# Altium PCB UHF_Reader_MultiFunction_V4.PcbDoc (part 2 of 3)
Units mm, origin at the board's own origin, x right, y up, seen from the top; angles counter-clockwise.
Board outline 74.4 x 63.4 mm, 6 copper layers (Top Layer, Internal Plane 1, Signal Layer 1, Signal Layer 2, Signal Layer 3, Bottom Layer), stack 1.21 mm thick; 381 components, 239 nets, 1152 pads, 1873 vias.
Unrouted connection lines stored in the file: 49.
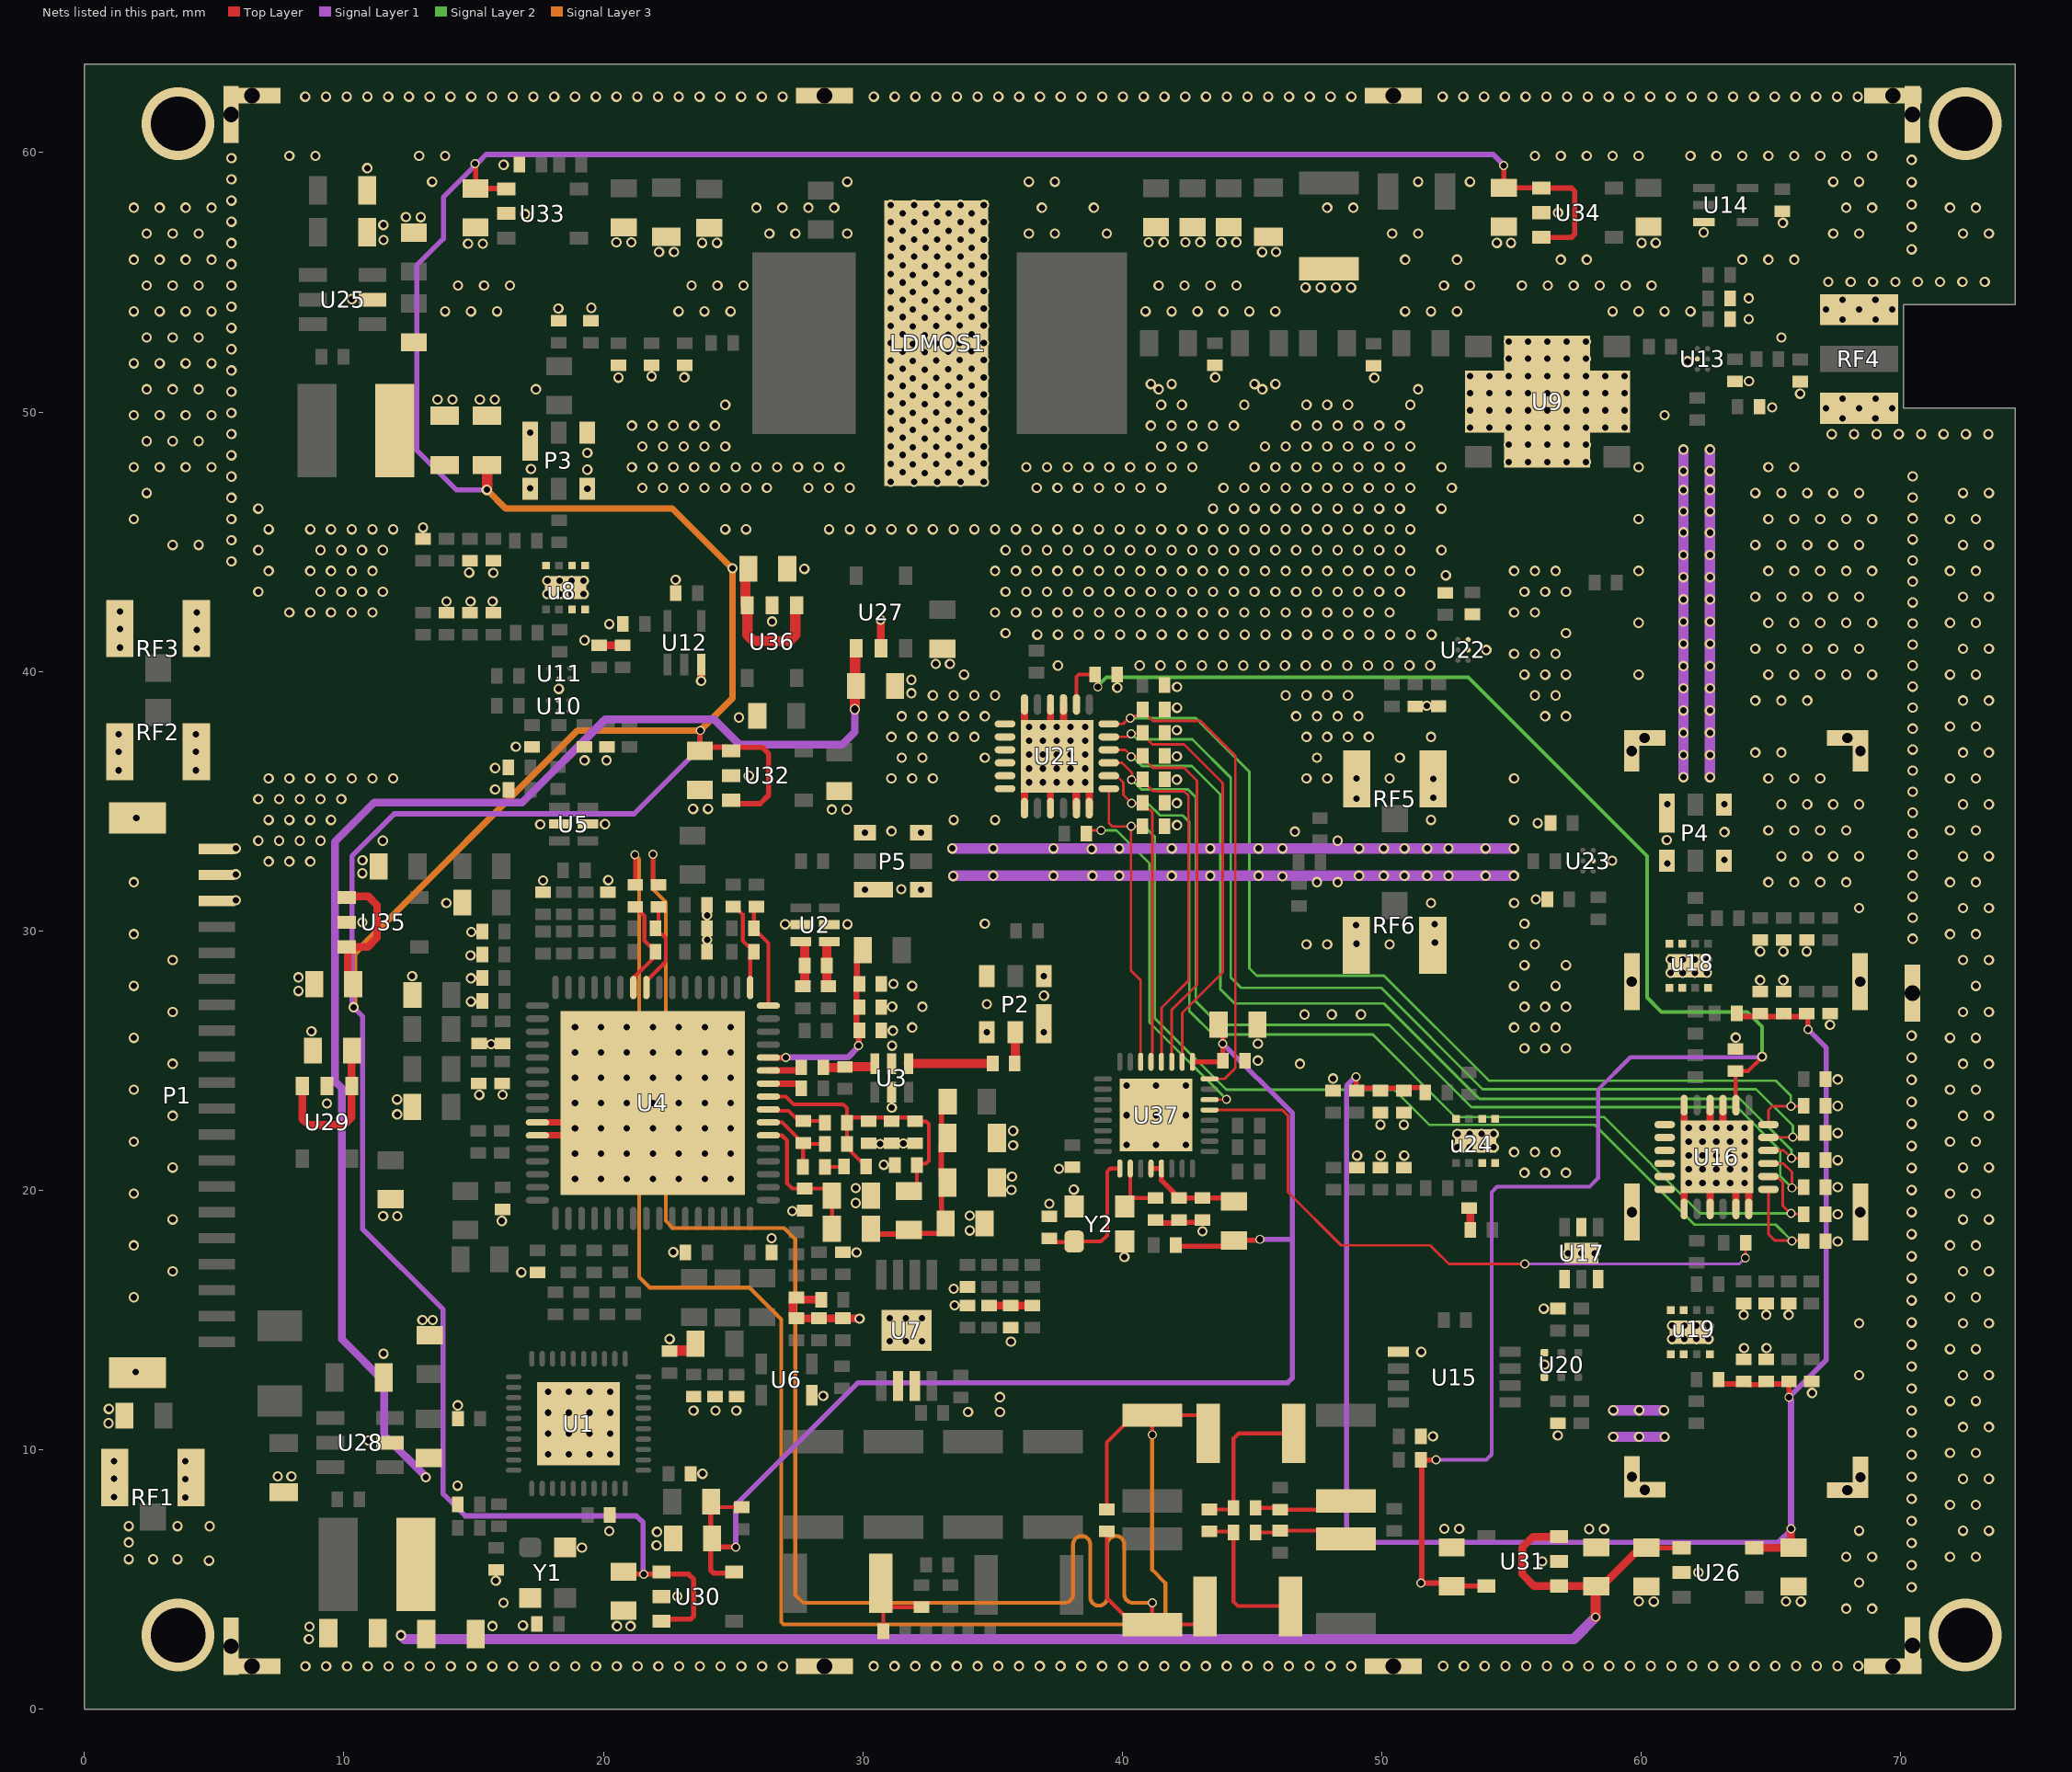
[diagram p6: the nets of this part, all layers, seen from the top]

## Via types
v1: diameter 0.4, hole 0.25, Top Layer to Bottom Layer, tented both sides, 1555 vias
v2: diameter 0.4, hole 0.25, Top Layer to Bottom Layer, tented top, 149 vias
v3: diameter 0.35, hole 0.25, Top Layer to Bottom Layer, tented both sides, 117 vias
v4: diameter 0.4, hole 0.25, Top Layer to Bottom Layer, 32 vias
v5: diameter 0.4, hole 0.3, Top Layer to Bottom Layer, tented both sides, 12 vias
v6: diameter 0.4, hole 0.3, Top Layer to Bottom Layer, 4 vias
v7: diameter 2.8, hole 2.1, Top Layer to Bottom Layer, 4 vias

## Nets (pads, with @x,y where several pads share a name; then routed paths per layer and width w, separated by ;. In a path a pad name is that pad's centre, name@x,y a point inside that pad or via, vN(x,y) a via of type N, cw(c..) or ccw(c..) an arc to the next point about the centre after c; other vN are vias at no path point) (continued)
ATTN1_D1: C130.2 C162.2 U16.24 U21.24 U37.16 | length 57.3
  Top Layer w0.1: U21.24@39.482,37.978 40.032,37.978 40.256,38.201 40.375,38.201 40.464,38.29 40.61,38.29 40.744,38.425 40.744,38.5 C162.2@40.785,38.54 ; C162.2@40.785,38.465 40.96,38.29 40.983,38.29 41.183,38.09 43.01,38.09 44.359,36.741 44.359,24.712 43.941,24.294 U37.16@43.364,24.294 ; U16.24@64.904,22.533 64.904,23.095 65.047,23.239 v3(65.769,23.239) 66.229,23.239 66.235,23.233 C130.2@66.257,23.256
  Signal Layer 2 w0.1: v3@40.357,38.136 40.423,38.201 42.832,38.201 44.9,36.133 44.9,28.558 45.182,28.276 50.082,28.276 54.132,24.226 ; 54.157,24.226 65.182,24.226 65.769,23.639 v3(65.769,23.239)
  other v3: 40.307,38.201
ATTN1_D2: C132.2 C163.2 U16.23 U21.23 U37.18 | length 54.9
  Top Layer w0.1: U21.23@39.482,37.478 40.25,37.478 40.34,37.567 v3(40.34,37.601) 40.344,37.605 40.751,37.605 C163.2@40.785,37.639 40.785,37.564 41.16,37.189 42.381,37.189 43.875,35.695 43.875,28.396 42.315,26.836 U37.18@42.315,24.951 ; U16.23@64.904,22.033 64.912,22.041 65.834,22.041 v3(65.842,22.05) 65.859,22.033 66.078,22.033 C132.2@66.257,22.212
  Signal Layer 2 w0.1: v3@40.307,37.551 40.402,37.551 40.576,37.377 42.706,37.377 44.182,35.901 44.182,28.201 44.582,27.801 49.982,27.801 53.882,23.901 64.432,23.901 65.842,22.491 v3(65.842,22.05)
ATTN1_D3: C133.2 C164.2 U16.22 U21.22 U37.19 | length 52.9
  Top Layer w0.1: U21.22@39.482,36.978 40.11,36.978 40.347,36.741 v3(40.347,36.714) 40.761,36.714 C164.2@40.785,36.737 ; C164.2@40.785,36.685 41.182,36.289 41.346,36.289 41.35,36.284 42.383,36.284 42.875,35.792 42.875,27.924 41.902,26.951 41.902,26.18 ; U37.19@41.907,24.951 41.907,26.18 ; U16.22@64.904,21.533 65.491,21.533 v3(65.788,21.236) 66.19,21.236 C133.2@66.257,21.169
  Signal Layer 2 w0.1: v3@40.457,36.651 40.757,36.351 42.682,36.351 43.782,35.251 43.782,27.851 43.774,27.842 43.774,27.76 44.332,27.201 50.082,27.201 53.732,23.551 ; 53.757,23.526 63.807,23.526 65.788,21.546 v3(65.788,21.236)
ATTN1_D4: C135.1 C165.1 U16.21 U21.21 U37.20 | length 53.5
  Top Layer w0.1: U21.21@39.482,36.478 39.988,36.478 40.378,36.088 40.378,35.849 v3(40.353,35.824) 40.775,35.824 C165.1@40.785,35.834 ; C165.1@40.785,35.783 41.181,35.386 41.346,35.386 41.348,35.384 42.381,35.384 42.55,35.215 42.55,28.075 41.507,27.032 U37.20@41.507,24.951 ; U16.21@64.904,21.033 65.477,21.033 65.805,20.705 65.805,20.1 v3(65.811,20.095) C135.1@66.164,20.095
  Signal Layer 2 w0.1: v3@40.407,35.751 40.44,35.751 40.74,35.451 42.532,35.451 42.832,35.151 42.832,27.276 43.732,26.376 50.282,26.376 53.457,23.201 ; 53.507,23.201 63.698,23.201 65.357,21.541 65.357,20.548 v3(65.811,20.095)
ATTN1_D5: C138.1 C166.1 U16.20 U21.20 U37.21 | length 50.9
  Top Layer w0.1: U21.20@39.482,35.978 39.771,35.978 40.039,35.71 40.039,35.24 v3(40.355,34.924) 40.357,34.922 40.774,34.922 C166.1@40.794,34.942 ; C166.1@40.785,34.933 40.785,34.857 40.96,34.683 41.049,34.683 41.157,34.574 41.157,25.278 41.107,25.228 U37.21@41.107,24.951 ; U16.20@64.904,20.533 65.215,20.533 65.454,20.294 65.454,19.405 65.746,19.112 v3(65.771,19.112) ; v3@65.746,19.081 C138.1@66.257,19.081
  Signal Layer 2 w0.1: v3@40.403,34.944 40.423,34.924 40.985,34.924 41.457,34.451 42.332,34.451 42.582,34.201 42.582,26.918 43.499,26.001 49.657,26.001 52.807,22.851 ; 52.832,22.826 58.557,22.826 62.271,19.112 v3(65.771,19.112)
ATTN1_D6: C139.1 C167.1 U16.19 U21.19 U37.22 | length 51.3
  Top Layer w0.1: U21.19@39.482,35.478 39.482,34.161 39.618,34.025 40.336,34.025 40.336,28.473 40.707,28.101 U37.22@40.707,24.951 ; v3(40.338,34.037) 40.756,34.037 40.767,34.025 C167.1@40.782,34.04 ; U16.19@64.904,20.033 64.904,18.304 65.147,18.061 66.234,18.061 C139.1@66.257,18.038
  Signal Layer 2 w0.1: v3(40.338,34.037) 40.847,34.037 41.257,33.626 41.257,26.626 44.007,23.876 50.482,23.876 51.832,22.526 ; 51.852,22.522 58.203,22.522 58.357,22.367 62.049,18.676 65.182,18.676 v3(65.809,18.049)
DC_5V: C191.1 C194.1 C195.1 C196.1 C204.1 L47.1 R53.2 U26.1 U27.1 U31.1 U31.3 | length 109
  Top Layer w0.2: C191.1@60.202,6.227 60.213,6.217 U26.1@61.561,6.217
  Top Layer w0.3: U31.3@56.834,6.647 55.834,6.647 55.408,6.222 55.408,5.21 55.871,4.747 U31.1@56.834,4.747 58.263,4.747 C204.1@58.273,4.737 ; C204.1@58.246,4.71 C204.1@58.273,4.737 ; C191.1@60.202,6.227 59.973,6.227 58.483,4.737 C204.1@58.273,4.737
  Top Layer w0.4: v5(29.691,38.539) C196.1@29.691,39.439 ; C196.1@29.739,39.439 29.702,39.476 29.702,40.842 U27.1@29.749,40.89 ; v3(58.246,3.546) C204.1@58.246,4.71
  Signal Layer 1 w0.3: v1@13.157,8.965 11.55,10.573 11.55,12.633 9.925,14.258 9.925,23.928 9.65,24.203 9.65,33.425 11.175,34.95 16.875,34.95 20.076,38.151 24.274,38.151 25.25,37.175 29.2,37.175 29.691,37.666 v5(29.691,38.539)
  Signal Layer 1 w0.4: v1(12.196,2.847) 12.343,2.7 57.4,2.7 v3(58.246,3.546)
  other v1: 13.157,8.941
EX_CTL: R18.1 R21.2 R22.2 | length 1.7
  Top Layer w0.3: R18.1@34.834,15.568 34.843,15.559 R22.2@36.528,15.559
GD32_VDDA: C218.2 C219.2 L48.2 U37.4 U37.5 | length 4
  Top Layer w0.2: U37.4@41.107,20.837 U37.5@41.507,20.837 41.507,20.381 C218.2@42.183,19.705 C219.2@43.083,19.705 44.163,19.705 L48.2@44.3,19.568
GD_OSC_IN: C217.2 U37.1 Y2.1 | length 5.1
  Top Layer w0.15: C217.2@37.007,18.088 37.095,18 37.744,18 ; Y2.1@38.144,18.025 39.18,18.025 39.418,18.264 39.418,20.721 39.534,20.837 U37.1@39.907,20.837
GD_OSC_OUT: C216.1 U37.2 Y2.3 | length 2.6
  Top Layer w0.15: Y2.3@40.094,19.375 Y2.3@40.307,19.589 ; U37.2@40.307,20.837 Y2.3@40.307,19.589 ; C216.1@41.283,19.705 40.424,19.705 Y2.3@40.307,19.589
GND: C1.2 C2.2 C3.1 C5.2 C6.2 C7.1 C8.2 C9.2 C10.1 C11.1 C12.1 C13.1 C17.1 C25.1 C26.1 C31.1 C32.1 C33.1 C43.1 C49.1 C50.1 C51.1 C52.1 C58.2 C59.1 C60.2 C61.1 C62.1 C63.1 C64.2 C65.2 C66.1 C67.1 C68.1 C69.1 C70.1 C71.1 C72.1 C73.2 C74.2 C75.1 C76.1 C77.1 C78.1 C80.2 C81.1 C85.1 C86.1 C87.2 C88.1 C89.1 C90.1 C91.1 C92.1 C93.1 C94.2 C95.1 C96.1 C97.2 C98.1 C99.1 C100.1 C102.1 C103.1 C110.2 C111.2 C112.2 C113.1 C114.1 C115.1 C118.1 C119.1 C122.1 C123.2 C125.2 C126.2 C128.2 C129.2 C130.1 C131.2 C132.1 C133.1 C134.1 C135.2 C136.2 C137.2 C138.2 C139.2 C141.1 C142.1 C143.1 C144.1 C145.1 C146.1 C147.1 C148.1 C149.1 C150.1 C152.2 C161.2 C162.1 C163.1 C164.1 C165.2 C166.2 C167.2 C168.2 C169.1 C170.1 C171.1 C172.2 C173.2 C174.1 C175.2 C177.1 C184.2 C185.2 C187.2 C188.2 C189.2 C190.2 C191.2 C192.2 C194.2 C195.2 C196.2 C197.2 C198.2 C199.2 C200.2 C201.2 C202.2 C203.2 C204.2 C205.2 C206.2 C207.2 C208.2 C209.2 C210.2 C211.2 C212.2 C213.2 C214.2 C215.2 C216.2 C217.1 C218.1 C219.1 C220.1 C221.1 D1.2 L3.1 LDMOS1.3 P1.18 P1.19 P1.20 P1.21 P2.1 P2.3 P2.4 P2.6 P3.1 P3.3 P3.4 P3.6 P4.1 P4.3 P4.4 P4.6 P5.1 P5.3 P5.4 P5.6 pad.1 R14.2 R15.2 R20.1 R21.1 R23.1 R30.1 R31.1 R32.1 R33.1 R36.2 R42.1 R51.1 R54.1 R57.1 RF1.2 RF1.3 RF2.2 RF2.3 RF3.2 RF3.3 RF4.2 RF4.3 RF5.2 RF5.3 RF6.2 RF6.3 RX2.2 U1.41 U2.2 U2.5 U3.2 U3.5 U4.26 U4.27 U4.65 U5.2 U5.5 U6.2 U7.6 U7.7 U7.9 u8.0 u8.3 u8.4 u8.5 u8.6 u8.8 U9.5 U10.2 U11.2 U12.3 U13.2 U14.3 U15.5 U16.3 U16.4 U16.6 U16.7 U16.8 U16.9 U16.10 U16.11 U16.12 U16.13 U16.15 U16.17 U16.18 U16.25 U17.1 U17.3 U17.5 U17.7 u18.0 u18.3 u18.4 u18.5 u18.6 u18.8 u19.0 u19.3 u19.4 u19.5 u19.6 u19.8 U20.3 U20.4 U21.3 U21.4 U21.6 U21.7 U21.8 U21.9 U21.10 U21.11 U21.12 U21.13 U21.15 U21.17 U21.18 U21.25 U22.2 U23.2 u24.0 u24.3 u24.4 u24.5 u24.6 u24.8 U25.2 U26.2 U27.2 U28.2 U29.2 U30.2 U31.2 U32.2 U33.2 U34.2 U35.2 U36.2 U37.33 Y1.2 Y1.4 Y2.2 Y2.4 | length 93.9
  Top Layer w0.1: v1(10.711,32.218) v1@10.713,32.22 ; v1@10.713,32.716 v1(10.715,32.718)
  Top Layer w0.2: C216.2@41.283,18.855 41.399,18.74 42.068,18.74 C218.1@42.183,18.855 42.277,18.762 42.99,18.762 C219.1@43.083,18.855
  Top Layer w0.25: U4.27@17.457,22.115 18.63,22.115 v1(18.907,22.392) 18.684,22.615 U4.26@17.457,22.615
  Top Layer w0.28: U21.3@37.732,38.728 37.732,37.598 ccw(c38.006,37.598) v1(38.006,37.324) ; v1(38.57,35.724) cw(c38.57,35.57) 38.724,35.57 U21.18@38.724,34.728 ; v1(62.895,21.879) 63.153,22.138 U16.3@63.153,23.283 ; v1(63.427,20.813) cw(c63.427,20.586) 63.654,20.586 U16.17@63.654,19.283 ; v1(63.991,20.813) cw(c63.991,20.658) 64.146,20.658 U16.18@64.146,19.283
  Top Layer w0.3: C103.1@19.875,41.025 19.89,41.01 C86.1@20.738,41.01 ; v1(23.764,39.637) 23.766,39.639 23.766,40.259 U12.3@23.768,40.261 ; R20.1@27.439,15.867 27.367,15.867 27.292,15.792 27.292,15.142 27.367,15.067 C74.2@27.439,15.067 R14.2@28.314,15.067 R15.2@29.227,15.067 29.842,15.067 v1@29.85,15.075 ; R20.1@27.531,15.85 27.599,15.782 C85.1@28.398,15.782 ; v1(30.687,41.987) 30.693,41.981 30.693,40.896 U27.2@30.699,40.889 ; U21.25@38.2,35.55 38.232,35.518 U21.17@38.232,34.728
  Top Layer w0.4: C2.2@22.525,13.8 22.547,13.822 23.398,13.822 23.548,13.972 C69.1@23.548,14.088
  Signal Layer 1 w0.4: v1(33.451,33.174) 38.806,33.175 v1(38.825,33.156) 38.844,33.175 v1(39.882,33.175) ; v1(33.483,32.112) 33.497,32.126 v1(35.03,32.126) 35.031,32.125 v1(38.85,32.125) 38.851,32.126 v1(41.907,32.126) ; v1@39.832,33.175 v1(41.907,33.175) v1(54,33.175) 54.002,33.177 v1(55.096,33.177) ; v1@41.932,32.126 v1(54,32.125) v1(54,32.125) v1(54,32.125) v1(55.096,32.126) ; v1@58.925,10.497 60.897,10.497 v1(60.9,10.5) v1@60.903,10.497 ; v1(58.925,11.521) 60.871,11.521 60.875,11.525 v1@60.879,11.521 ; v1(61.625,35.922) v1@61.625,45.336 ; v1@61.625,45.4 v1@61.625,48.55 ; v1(62.649,35.922) v1(62.649,45.348) ; v1@62.65,45.375 v1@62.65,48.525
  other v1: 8.518,1.65 9.318,1.65 10.118,1.65 10.918,1.65 11.718,1.65 12.518,1.65 13.318,1.65 14.118,1.65 14.918,1.65 15.718,1.649 16.518,1.65 17.318,1.65 18.118,1.65 18.918,1.65 19.718,1.65 20.518,1.65 21.318,1.65 22.118,1.65 22.918,1.65 23.718,1.65 24.518,1.65 25.318,1.65 26.118,1.65 26.918,1.65 30.421,1.659 31.221,1.659 32.021,1.659 32.821,1.659 33.621,1.659 34.421,1.659 35.221,1.659 36.021,1.659 36.821,1.659 37.621,1.659 38.421,1.659 39.221,1.659 40.021,1.659 40.821,1.659 41.621,1.659 42.421,1.659 43.221,1.659 44.021,1.659 44.821,1.659 45.621,1.659 46.421,1.659 47.221,1.659 48.021,1.659 48.821,1.659 52.367,1.662 53.167,1.662 53.967,1.662 54.767,1.662 55.567,1.662 56.367,1.662 57.167,1.662 57.967,1.662 58.767,1.662 59.567,1.662 60.367,1.662 61.167,1.662 61.967,1.662 62.767,1.662 63.567,1.662 64.367,1.662 65.167,1.662 65.967,1.662 66.767,1.662 67.567,1.662 68.367,1.662 8.65,2.7 8.675,3.175 15.725,3.2 20.525,3.2 21.05,3.2 16.9,3.226 67.9,3.875 68.9,3.875 16.15,4.1 59.909,4.149 60.484,4.147 65.577,4.149 66.152,4.147 22.85,4.35 70.424,4.702 68.4,4.875 15.857,4.951 62.204,5.268 70.424,5.552 56.19,5.696 4.8,5.725 1.707,5.776 2.645,5.776 3.582,5.776 67.9,5.875 68.9,5.875 71.9,5.875 72.9,5.875 19.173,6.228 22.046,6.313 70.424,6.402 1.707,6.426 22.067,6.832 20.227,6.867 68.4,6.875 72.4,6.875 73.4,6.875 57.991,6.944 58.567,6.942 52.409,6.955 52.984,6.953 1.707,7.051 3.582,7.051 4.825,7.05 70.424,7.253 71.9,7.875 72.9,7.875 70.424,8.103 3.89,8.157 1.147,8.17 14.378,8.611 3.89,8.871 72.4,8.875 73.4,8.875 1.147,8.884 7.45,8.975 7.975,8.975 70.424,8.953 23.82,9.072 3.89,9.55 1.147,9.562 70.424,9.804 17.866,9.827 18.666,9.827 19.466,9.827 20.266,9.827 71.9,9.875 72.9,9.875 10.948,10.354 58.925,10.5 59.921,10.5 51.973,10.516 56.783,10.553 17.866,10.627 18.666,10.627 19.466,10.627 20.266,10.627 70.424,10.654 72.4,10.875 73.4,10.875 0.928,11.019 17.866,11.427 18.666,11.427 19.466,11.427 20.266,11.427 34.057,11.451 35.282,11.451 23.475,11.51 24.325,11.51 25.125,11.51 70.424,11.504 59.921,11.521 60.875,11.521 0.939,11.571 14.389,11.709 71.9,11.875 72.9,11.875 35.282,12.026 28.475,12.075 66.584,12.187 17.866,12.227 18.666,12.227 19.466,12.227 20.266,12.227 70.424,12.355 68.4,12.875 72.4,12.875 73.4,12.875 1.975,13 70.424,13.205 56.27,13.278 11.525,13.7 51.519,13.768 71.9,13.875 72.9,13.875 63.96,13.92 64.831,13.92 70.424,14.055 31.032,14.176 31.657,14.176 32.282,14.176 35.709,14.168 22.557,14.264 68.4,14.875 72.4,14.875 73.4,14.875 70.424,14.906 13.425,14.996 13.025,15 29.875,15.05 31.032,15.076 31.657,15.076 32.282,15.076 63.948,15.2 64.815,15.2 65.682,15.2 56.247,15.435 33.535,15.569 70.424,15.756 1.9,15.875 71.9,15.875 72.9,15.875 33.502,16.202 70.424,16.606 16.838,16.837 3.4,16.875 72.4,16.875 73.4,16.875 40.082,17.426 70.424,17.456 57.187,17.576 57.695,17.576 58.203,17.576 29.757,17.601 22.696,17.614 1.9,17.875 71.9,17.875 72.9,17.875 67.575,18.031 26.482,18.151 70.424,18.307 43.09,18.417 34.125,18.45 16.088,18.818 3.4,18.875 72.4,18.875 73.4,18.875 11.513,19.001 12.061,19.001 34.125,19.025 67.575,19.074 70.424,19.157 27.282,19.201 37.186,19.482 29.728,19.508 1.9,19.875 71.9,19.875 72.9,19.875 35.727,20.014 70.424,20.007 38.132,20.026 29.73,20.084 67.575,20.118 61.832,20.28 62.363,20.28 62.895,20.28 63.427,20.28 63.991,20.28 18.907,20.446 19.907,20.446 20.907,20.446 21.907,20.446 22.907,20.446 23.907,20.446 24.907,20.446 35.746,20.529 55.5,20.675 56.3,20.675 57.1,20.675 61.832,20.813 62.363,20.813 62.895,20.813 37.558,20.828 70.424,20.858 3.4,20.875 72.4,20.875 73.4,20.875 30.812,20.984 67.575,21.162 49.051,21.339 49.957,21.339 50.863,21.339 61.832,21.346 62.363,21.346 62.895,21.346 63.427,21.346 63.991,21.346 18.907,21.419 19.907,21.419 20.907,21.419 21.907,21.419 22.907,21.419 23.907,21.419 24.907,21.419 55.1,21.475 55.9,21.475 56.7,21.475 70.424,21.708 35.793,21.73 40.164,21.751 41.307,21.751 42.45,21.751 30.665,21.787 31.561,21.806 1.9,21.875 61.832,21.879 62.363,21.879 63.427,21.879 63.991,21.879 71.9,21.875 72.9,21.875 67.575,22.205 35.796,22.292 19.907,22.392 20.907,22.392 21.907,22.392 22.907,22.392 23.907,22.392 24.907,22.392 61.832,22.413 62.363,22.413 62.895,22.413 63.427,22.413 63.991,22.413 49.949,22.525 50.855,22.525 70.424,22.558 3.4,22.875 40.164,22.894 41.307,22.894 42.45,22.894 72.4,22.875 73.4,22.875 12.05,22.925 31.115,23.183 67.575,23.249 9.348,23.347 18.907,23.365 19.907,23.365 20.907,23.365 21.907,23.365 22.907,23.365 23.907,23.365 24.907,23.365 70.424,23.409 12.049,23.499 15.217,23.678 16.12,23.679 1.9,23.875 71.9,23.875 72.9,23.875 40.164,24.037 41.307,24.037 42.45,24.037 70.424,24.259 67.575,24.274 48.124,24.31 18.907,24.338 19.907,24.338 20.907,24.338 21.907,24.338 22.907,24.338 23.907,24.338 24.907,24.338 3.4,24.875 46.85,24.875 72.4,24.875 73.4,24.875 45.225,25 70.424,25.109 18.907,25.311 19.907,25.311 20.907,25.311 21.907,25.311 22.907,25.311 23.907,25.311 24.907,25.311 55.5,25.475 56.3,25.475 57.1,25.475 31.125,25.575 15.67,25.636 45.225,25.65 1.9,25.875 63.643,25.888 71.9,25.875 72.9,25.875 70.424,25.96 34.781,26.098 36.982,26.098 8.75,26.126 31.157,26.151 18.907,26.284 19.907,26.284 20.907,26.284 21.907,26.284 22.907,26.284 23.907,26.284 24.907,26.284 31.9,26.275 55.1,26.275 55.9,26.275 56.7,26.275 67.277,26.373 47.025,26.775 48.075,26.775 49.2,26.775 3.4,26.875 72.4,26.875 73.4,26.875 31.132,27.076 32.3,27.075 55.5,27.075 56.3,27.075 57.1,27.075 34.781,27.173 14.897,27.275 36.982,27.501 8.249,27.682 1.9,27.875 31.9,27.875 55.1,27.875 56.7,27.875 72.9,27.875 31.183,27.95 64.581,28.101 65.48,28.101 14.897,28.171 8.249,28.207 36.981,28.248 12.632,28.258 55.5,28.675 57.1,28.675 3.4,28.875 72.4,28.875 73.4,28.875 14.882,29.051 64.582,29.206 65.481,29.206 66.38,29.206 47.1,29.475 47.9,29.475 50.3,29.475 55.1,29.475 55.9,29.475 49.03,29.505 52.05,29.544 23.999,29.657 70.462,29.695 1.9,29.875 71.9,29.875 72.9,29.875 14.907,29.959 49.016,30.224 27.007,30.251 29.407,30.251 52.041,30.252 34.7,30.275 55.5,30.275 10.707,30.325 70.462,30.505 23.999,30.602 68.4,30.875 72.4,30.875 73.4,30.875 13.95,31.07 51.9,31.075 55.1,31.075 5.83,31.177 55.936,31.211 70.462,31.315 30.087,31.583 31.482,31.601 32.237,31.583 1.9,31.875 47.5,31.875 48.3,31.875 64.9,31.875 65.9,31.875 66.9,31.875 67.9,31.875 71.9,31.875 72.9,31.875 17.675,31.944 20.186,31.953 46.175,32.1 37.35,32.125 39.882,32.126 43.391,32.126 45.25,32.126 49.125,32.125 50.079,32.126 50.875,32.125 51.751,32.126 52.575,32.125 70.462,32.125 5.83,32.177 61,32.6 7.1,32.675 7.9,32.675 8.7,32.675 58.882,32.701 63.211,32.733 65.4,32.875 66.4,32.875 67.4,32.875 68.4,32.875 72.4,32.875 73.4,32.875 70.462,32.935 5.83,33.177 35.03,33.175 37.35,33.175 43.391,33.175 45.25,33.175 46.175,33.175 49.125,33.175 50.079,33.175 50.875,33.175 51.751,33.175 52.575,33.175 6.7,33.475 7.5,33.475 8.3,33.475 9.1,33.475 11.5,33.475 48.3,33.475 60.982,33.501 70.462,33.745 30.087,33.783 32.237,33.783 63.211,33.808 31.103,33.842 46.65,33.825 64.9,33.875 65.9,33.875 66.9,33.875 67.9,33.875 71.9,33.875 72.9,33.875 42.107,34.076 17.563,34.105 20.062,34.112 56.007,34.152 7.1,34.275 7.9,34.275 8.7,34.275 9.5,34.275 33.5,34.275 35.1,34.275 51.9,34.275 55.1,34.275 2,34.35 70.462,34.555 28.806,34.677 29.382,34.679 23.457,34.701 24.032,34.701 61.011,34.883 63.211,34.883 65.4,34.875 66.4,34.875 67.4,34.875 68.4,34.875 72.4,34.875 73.4,34.875 42.102,34.926 6.7,35.075 7.5,35.075 8.3,35.075 9.1,35.075 9.9,35.075 49.03,35.104 51.984,35.126 70.462,35.366 15.825,35.45 36.41,35.724 36.942,35.724 37.474,35.724 38.006,35.724 42.102,35.827 7.1,35.875 7.9,35.875 8.7,35.875 9.5,35.875 10.3,35.875 11.1,35.875 11.9,35.875 31.1,35.875 31.9,35.875 32.7,35.875 47.1,35.875 47.9,35.875 50.3,35.875 51.987,35.851 55.1,35.875 64.9,35.875 65.9,35.875 66.9,35.875 71.9,35.875 72.9,35.875 49.03,35.883 25.607,35.976 70.462,36.176 1.325,36.186 4.297,36.186 15.825,36.275 36.41,36.258 36.942,36.258 37.474,36.258 38.006,36.258 38.57,36.258 19.275,36.575 20.125,36.575 31.5,36.675 32.3,36.675 34.7,36.675 47.5,36.675 50.7,36.675 42.102,36.73 61.625,36.779 62.649,36.779 36.41,36.791 36.942,36.791 37.474,36.791 38.006,36.791 38.57,36.791 64.4,36.875 65.4,36.875 72.4,36.875 73.4,36.875 1.325,36.9 4.297,36.9 70.462,36.986 16.625,37.1 36.41,37.324 36.942,37.324 37.474,37.324 38.57,37.324 31.1,37.475 31.9,37.475 32.7,37.475 33.5,37.475 34.3,37.475 47.1,37.475 47.9,37.475 48.7,37.475 49.5,37.475 51.9,37.475 1.325,37.579 4.297,37.579 61.625,37.636 62.649,37.636 42.102,37.74 70.462,37.796 36.41,37.857 36.942,37.857 37.474,37.857 38.006,37.857 38.57,37.857 71.9,37.875 72.9,37.875 25.225,38.225 31.5,38.275 32.3,38.275 33.1,38.275 33.9,38.275 34.7,38.275 46.7,38.275 47.5,38.275 48.3,38.275 49.1,38.275 56.3,38.275 57.1,38.275 61.625,38.493 62.649,38.493 42.107,38.599 70.462,38.606 51.732,38.676 64.4,38.875 65.4,38.875 66.4,38.875 72.4,38.875 73.4,38.875 32.7,39.075 33.5,39.075 34.3,39.075 35.1,39.075 46.3,39.075 47.1,39.075 47.9,39.075 48.7,39.075 55.9,39.075 56.7,39.075 31.871,39.162 18.282,39.326 61.625,39.35 62.649,39.35 39.807,39.376 42.107,39.401 70.462,39.416 31.871,39.678 33.9,39.875 55.5,39.875 56.3,39.875 57.1,39.875 59.9,39.875 64.9,39.875 65.9,39.875 66.9,39.875 67.9,39.875 68.9,39.875 71.9,39.875 72.9,39.875 61.625,40.207 62.649,40.207 37.52,40.226 40.67,40.226 41.47,40.226 42.27,40.226 43.07,40.226 43.87,40.226 44.67,40.226 45.47,40.226 46.27,40.226 47.07,40.226 47.87,40.226 48.67,40.226 49.47,40.226 50.27,40.226 51.07,40.226 51.87,40.226 70.462,40.226 32.809,40.288 33.353,40.288 55.1,40.675 55.9,40.675 56.7,40.675 54.032,40.826 64.4,40.875 65.4,40.875 66.4,40.875 67.4,40.875 68.4,40.875 72.4,40.875 73.4,40.875 4.325,40.884 1.366,40.917 70.462,41.036 61.625,41.063 62.649,41.063 19.275,41.201 36.72,41.418 37.52,41.418 38.32,41.418 39.12,41.418 39.92,41.418 40.72,41.418 41.52,41.418 42.32,41.418 43.12,41.418 43.92,41.418 44.72,41.418 45.52,41.418 46.32,41.418 47.12,41.418 47.92,41.418 48.72,41.418 49.52,41.418 50.32,41.418 51.12,41.418 51.92,41.418 35.5,41.475 57.1,41.475 4.325,41.598 1.366,41.631 20.225,41.825 70.462,41.846 59.9,41.875 64.9,41.875 65.9,41.875 66.9,41.875 67.9,41.875 68.9,41.875 71.9,41.875 72.9,41.875 61.625,41.92 62.649,41.92 26.5,41.925 7.9,42.275 8.7,42.275 9.5,42.275 10.3,42.275 11.1,42.275 35.1,42.275 35.9,42.275 36.7,42.275 37.5,42.275 38.3,42.275 39.1,42.275 39.9,42.275 40.7,42.275 41.5,42.275 42.3,42.275 43.1,42.275 43.9,42.275 44.7,42.275 45.5,42.275 46.3,42.275 47.1,42.275 47.9,42.275 48.7,42.275 49.5,42.275 50.3,42.275 55.1,42.275 55.9,42.275 4.325,42.277 1.366,42.31 70.462,42.657 13.957,42.701 14.882,42.701 15.732,42.701 61.625,42.777 62.649,42.777 64.4,42.875 65.4,42.875 66.4,42.875 67.4,42.875 68.4,42.875 72.4,42.875 73.4,42.875 6.7,43.075 9.1,43.075 9.9,43.075 10.7,43.075 11.5,43.075 35.5,43.075 36.3,43.075 37.1,43.075 37.9,43.075 38.7,43.075 39.5,43.075 40.3,43.075 41.1,43.075 41.9,43.075 42.7,43.075 43.5,43.075 44.3,43.075 45.1,43.075 45.9,43.075 46.7,43.075 47.5,43.075 48.3,43.075 49.1,43.075 49.9,43.075 50.7,43.075 55.5,43.075 56.3,43.075 57.1,43.075 70.462,43.467 22.784,43.536 61.625,43.634 62.649,43.634 52.47,43.703 14.829,43.81 15.757,43.801 7.1,43.875 8.7,43.875 9.5,43.875 10.3,43.875 11.1,43.875 35.1,43.875 35.9,43.875 36.7,43.875 37.5,43.875 38.3,43.875 39.1,43.875 39.9,43.875 40.7,43.875 41.5,43.875 42.3,43.875 43.1,43.875 43.9,43.875 44.7,43.875 45.5,43.875 46.3,43.875 47.1,43.875 47.9,43.875 48.7,43.875 49.5,43.875 50.3,43.875 51.1,43.875 55.1,43.875 55.9,43.875 56.7,43.875 59.9,43.875 64.9,43.875 65.9,43.875 66.9,43.875 67.9,43.875 68.9,43.875 71.9,43.875 72.9,43.875 27.75,43.95 5.667,44.238 70.462,44.277 61.625,44.491 62.649,44.491 6.7,44.675 9.1,44.675 9.9,44.675 10.7,44.675 11.5,44.675 35.5,44.675 36.3,44.675 37.1,44.675 37.9,44.675 38.7,44.675 39.5,44.675 40.3,44.675 41.1,44.675 41.9,44.675 42.7,44.675 43.5,44.675 44.3,44.675 45.1,44.675 45.9,44.675 46.7,44.675 47.5,44.675 48.3,44.675 49.1,44.675 49.9,44.675 50.7,44.675 52.3,44.675 3.4,44.875 4.4,44.875 64.4,44.875 65.4,44.875 66.4,44.875 67.4,44.875 68.4,44.875 72.4,44.875 73.4,44.875 5.667,45.057 70.462,45.087 61.625,45.365 7.1,45.475 8.7,45.475 9.5,45.475 10.3,45.475 11.1,45.475 11.9,45.475 24.7,45.475 25.5,45.475 28.7,45.475 29.5,45.475 30.3,45.475 31.1,45.475 31.9,45.475 32.7,45.475 33.5,45.475 34.3,45.475 35.1,45.475 35.9,45.475 36.7,45.475 37.5,45.475 38.3,45.475 39.1,45.475 39.9,45.475 40.7,45.475 41.5,45.475 42.3,45.475 43.1,45.475 43.9,45.475 44.7,45.475 45.5,45.475 46.3,45.475 47.1,45.475 47.9,45.475 48.7,45.475 49.5,45.475 50.3,45.475 51.1,45.475 13.048,45.548 1.9,45.875 5.667,45.875 59.9,45.875 64.9,45.875 65.9,45.875 66.9,45.875 67.9,45.875 68.9,45.875 71.9,45.875 72.9,45.875 70.462,45.897 61.625,46.176 62.649,46.167 6.7,46.275 43.5,46.275 44.3,46.275 45.1,46.275 45.9,46.275 46.7,46.275 47.5,46.275 48.3,46.275 49.1,46.275 49.9,46.275 50.7,46.275 52.3,46.275 5.667,46.693 70.462,46.707 2.4,46.875 64.4,46.875 65.4,46.875 66.4,46.875 67.4,46.875 68.4,46.875 72.4,46.875 73.4,46.875 61.625,46.995 62.649,46.995 19.386,47.048 17.178,47.055 21.5,47.075 22.3,47.075 23.1,47.075 23.9,47.075 24.7,47.075 25.5,47.075 26.3,47.075 27.9,47.075 28.7,47.075 29.5,47.075 36.7,47.075 37.5,47.075 38.3,47.075 39.1,47.075 39.9,47.075 40.7,47.075 41.5,47.075 43.9,47.075 44.7,47.075 45.5,47.075 46.3,47.075 47.1,47.075 47.9,47.075 48.7,47.075 49.5,47.075 50.3,47.075 51.1,47.075 52.7,47.075 5.667,47.511 70.462,47.517 61.625,47.727 62.649,47.727 19.382,47.776 17.207,47.801 1.9,47.875 2.9,47.875 3.9,47.875 4.9,47.875 21.1,47.875 21.9,47.875 22.7,47.875 23.5,47.875 24.3,47.875 25.1,47.875 25.9,47.875 26.7,47.875 27.5,47.875 28.3,47.875 29.1,47.875 36.3,47.875 37.1,47.875 37.9,47.875 38.7,47.875 39.5,47.875 40.3,47.875 41.1,47.875 41.9,47.875 42.7,47.875 45.1,47.875 45.9,47.875 46.7,47.875 47.5,47.875 48.3,47.875 49.1,47.875 49.9,47.875 50.7,47.875 52.3,47.875 59.9,47.875 64.9,47.875 65.9,47.875 54.892,48.076 55.636,48.076 56.381,48.076 57.125,48.076 57.87,48.076 5.667,48.33 19.382,48.426 61.625,48.555 62.649,48.555 21.5,48.675 22.3,48.675 23.1,48.675 23.9,48.675 24.7,48.675 41.5,48.675 42.3,48.675 43.1,48.675 45.5,48.675 46.3,48.675 47.1,48.675 47.9,48.675 48.7,48.675 49.5,48.675 50.3,48.675 51.1,48.675 54.892,48.738 55.636,48.738 56.381,48.738 57.125,48.738 57.87,48.738 2.4,48.875 3.4,48.875 4.4,48.875 5.667,49.148 67.344,49.143 68.206,49.143 69.068,49.143 69.93,49.143 70.792,49.143 71.654,49.143 72.516,49.143 73.378,49.143 17.178,49.205 53.403,49.401 54.147,49.401 54.892,49.401 55.636,49.401 56.381,49.401 57.125,49.401 57.87,49.401 58.614,49.401 59.359,49.401 21.1,49.475 21.9,49.475 22.7,49.475 23.5,49.475 24.3,49.475 41.1,49.475 41.9,49.475 42.7,49.475 43.5,49.475 44.3,49.475 46.7,49.475 47.5,49.475 48.3,49.475 49.1,49.475 49.9,49.475 50.7,49.475 67.761,49.76 69.027,49.76 1.9,49.875 2.9,49.875 3.9,49.875 4.9,49.875 60.9,49.875 5.667,49.966 53.403,50.064 54.147,50.064 54.892,50.064 55.636,50.064 56.381,50.064 57.125,50.064 57.87,50.064 58.614,50.064 59.359,50.064 67.128,50.146 68.398,50.146 69.668,50.146 65.051,50.182 24.7,50.275 41.5,50.275 42.3,50.275 44.7,50.275 47.1,50.275 47.9,50.275 48.7,50.275 51.1,50.275 13.608,50.48 14.183,50.483 15.239,50.48 15.815,50.483 67.763,50.522 69.029,50.522 66.125,50.706 53.403,50.726 54.147,50.726 54.892,50.726 55.636,50.726 56.381,50.726 57.125,50.726 57.87,50.726 58.614,50.726 59.359,50.726 5.667,50.784 2.4,50.875 3.4,50.875 4.4,50.875 17.4,50.875 41.4,50.875 45.4,50.875 51.4,50.875 41.1,51.075 41.9,51.075 45.1,51.075 45.9,51.075 64.154,51.185 49.714,51.317 20.582,51.326 23.123,51.337 43.582,51.337 21.857,51.376 53.403,51.389 54.147,51.389 54.892,51.389 55.636,51.389 56.381,51.389 57.125,51.389 57.87,51.389 58.614,51.389 59.359,51.389 5.667,51.603 1.9,51.875 2.9,51.875 3.9,51.875 4.9,51.875 61.785,51.956 54.892,52.052 55.636,52.052 56.381,52.052 57.125,52.052 57.87,52.052 5.667,52.421 54.892,52.715 55.636,52.715 56.381,52.715 57.125,52.715 57.87,52.715 2.4,52.875 3.4,52.875 4.4,52.875 65.4,52.875 5.667,53.239 67.763,53.57 69.029,53.57 64.144,53.583 1.9,53.875 2.9,53.875 3.9,53.875 4.9,53.875 13.9,53.875 14.9,53.875 15.9,53.875 22.9,53.875 23.9,53.875 24.9,53.875 40.9,53.875 41.9,53.875 42.9,53.875 43.9,53.875 44.9,53.875 45.9,53.875 50.9,53.875 51.9,53.875 52.9,53.875 58.9,53.875 59.9,53.875 60.9,53.875 61.9,53.875 67.128,53.946 68.398,53.946 69.668,53.946 18.265,53.987 19.538,54.015 5.667,54.057 67.761,54.332 69.027,54.332 10.307,54.351 64.142,54.385 47.064,54.799 47.65,54.799 48.236,54.799 48.822,54.799 2.4,54.875 3.4,54.875 4.4,54.875 5.667,54.876 14.4,54.875 15.4,54.875 16.4,54.875 23.4,54.875 24.4,54.875 25.4,54.875 41.4,54.875 42.4,54.875 43.4,54.875 44.4,54.875 52.4,54.875 53.4,54.875 55.4,54.875 56.4,54.875 57.4,54.875 58.4,54.875 59.4,54.875 60.4,54.875 67.21,55.017 68.072,55.017 68.934,55.017 69.796,55.017 70.658,55.017 71.52,55.017 72.382,55.017 73.243,55.017 5.667,55.694 1.9,55.875 2.9,55.875 3.9,55.875 4.9,55.875 50.9,55.875 52.9,55.875 56.9,55.875 57.9,55.875 63.9,55.875 64.9,55.875 65.9,55.875 22.146,56.169 22.721,56.169 45.388,56.165 45.929,56.172 70.424,56.27 14.78,56.485 15.355,56.488 5.667,56.512 23.804,56.516 24.38,56.519 54.438,56.519 54.979,56.519 60.018,56.519 60.559,56.519 20.503,56.539 21.079,56.541 41.018,56.542 41.594,56.545 42.434,56.542 43.009,56.545 43.821,56.542 44.397,56.545 11.524,56.633 2.4,56.875 3.4,56.875 4.4,56.875 26.4,56.875 27.4,56.875 29.4,56.875 36.4,56.875 37.4,56.875 39.4,56.875 50.4,56.875 51.4,56.875 67.4,56.875 68.4,56.875 72.4,56.875 73.4,56.875 62.408,56.921 70.424,57.132 11.522,57.208 65.46,57.291 5.667,57.331 12.388,57.512 12.963,57.509 16.982,57.626 56.796,57.682 1.9,57.875 2.9,57.875 3.9,57.875 4.9,57.875 25.9,57.875 26.9,57.875 27.9,57.875 28.9,57.875 36.9,57.875 38.9,57.875 47.9,57.875 48.9,57.875 67.9,57.875 68.9,57.875 71.9,57.875 72.9,57.875 70.424,57.994 5.667,58.149 70.424,58.856 13.4,58.875 29.4,58.875 36.4,58.875 37.4,58.875 51.4,58.875 53.4,58.875 67.4,58.875 68.4,58.875 5.667,58.967 10.9,59.4 16.157,59.526 70.424,59.718 5.667,59.785 7.9,59.875 8.9,59.875 12.9,59.875 13.9,59.875 55.9,59.875 56.9,59.875 57.9,59.875 58.9,59.875 59.9,59.875 61.9,59.875 62.9,59.875 63.9,59.875 64.9,59.875 65.9,59.875 66.9,59.875 67.9,59.875 68.9,59.875 8.507,62.151 9.307,62.151 10.107,62.151 10.907,62.151 11.707,62.151 12.507,62.151 13.307,62.151 14.107,62.151 14.907,62.151 15.707,62.15 16.507,62.151 17.307,62.151 18.107,62.151 18.907,62.151 19.707,62.151 20.507,62.151 21.307,62.151 22.107,62.151 22.907,62.151 23.707,62.151 24.507,62.151 25.307,62.151 26.107,62.151 26.907,62.151 30.426,62.151 31.226,62.151 32.026,62.151 32.826,62.151 33.626,62.151 34.426,62.151 35.226,62.151 36.026,62.151 36.826,62.151 37.626,62.151 38.426,62.151 39.226,62.151 40.026,62.151 40.826,62.151 41.626,62.151 42.426,62.151 43.226,62.151 44.026,62.151 44.826,62.151 45.626,62.151 46.426,62.151 47.226,62.151 48.026,62.151 48.826,62.151 52.345,62.151 53.145,62.151 53.945,62.151 54.745,62.151 55.545,62.151 56.345,62.151 57.145,62.151 57.945,62.151 58.745,62.151 59.545,62.151 60.345,62.151 61.145,62.151 61.945,62.151 62.745,62.151 63.545,62.151 64.345,62.151 65.145,62.151 65.945,62.151 66.745,62.151 67.545,62.151 68.345,62.151
  other v2: 31.077,47.309 31.974,47.309 32.87,47.309 33.766,47.309 34.663,47.309 32.388,47.648 31.539,47.679 33.295,47.666 34.2,47.685 31.926,47.973 31.077,48.005 32.834,47.991 33.738,48.01 34.663,48.01 32.388,48.313 31.539,48.344 33.295,48.331 34.2,48.35 31.926,48.638 31.077,48.669 32.834,48.656 33.738,48.675 34.663,48.674 32.388,48.977 33.295,48.995 31.539,49.008 34.2,49.014 31.926,49.303 31.077,49.334 32.834,49.321 33.738,49.34 34.663,49.339 32.388,49.642 33.295,49.66 31.539,49.673 34.2,49.679 31.926,49.968 32.834,49.986 31.077,49.999 33.738,50.004 34.663,50.003 32.388,50.306 33.295,50.324 31.539,50.337 34.2,50.343 31.926,50.632 32.834,50.65 31.077,50.664 33.738,50.669 34.663,50.668 32.388,50.971 31.539,51.002 33.295,50.989 34.2,51.008 31.926,51.297 32.834,51.315 31.077,51.328 33.738,51.334 34.663,51.332 32.388,51.635 31.539,51.666 33.295,51.653 34.2,51.672 31.926,51.962 31.077,51.993 32.834,51.98 33.738,51.999 34.663,51.997 32.388,52.3 31.539,52.331 33.295,52.318 34.2,52.337 31.926,52.627 31.077,52.658 32.834,52.645 33.738,52.664 34.663,52.661 32.388,52.964 33.295,52.982 31.539,52.995 34.2,53.001 31.926,53.292 31.077,53.323 32.834,53.309 33.738,53.328 34.663,53.326 32.388,53.629 33.295,53.647 31.539,53.66 34.2,53.666 31.926,53.956 32.834,53.974 31.077,53.987 33.738,53.993 34.663,53.99 32.388,54.293 33.295,54.311 31.539,54.324 34.2,54.33 31.926,54.621 32.834,54.639 31.077,54.652 33.738,54.658 34.663,54.655 32.388,54.958 33.295,54.976 31.539,54.989 34.2,54.995 31.926,55.286 32.834,55.304 31.077,55.317 33.738,55.323 34.663,55.319 32.388,55.622 31.539,55.653 33.295,55.64 34.2,55.659 31.077,55.987 31.974,55.987 32.87,55.987 33.766,55.987 34.663,55.987 31.539,56.324 32.426,56.324 33.313,56.324 34.2,56.324 31.077,56.652 31.974,56.652 32.87,56.652 33.766,56.652 34.663,56.652 31.539,56.988 32.426,56.988 33.313,56.988 34.2,56.988 31.077,57.317 31.974,57.317 32.87,57.317 33.766,57.317 34.663,57.317 31.539,57.653 32.426,57.653 33.313,57.653 34.2,57.653 31.077,57.982 31.974,57.982 32.87,57.982 33.766,57.982 34.663,57.982
  other v4: 61.194,14.266 61.659,14.266 62.125,14.266 62.591,14.266 61.194,14.782 61.659,14.782 62.125,14.782 62.591,14.782 52.917,21.656 53.383,21.656 53.849,21.656 54.315,21.656 52.917,22.172 53.383,22.172 53.849,22.172 54.315,22.172 61.136,28.384 61.602,28.384 62.068,28.384 62.533,28.384 61.136,28.9 61.602,28.9 62.068,28.9 62.533,28.9 17.843,42.979 18.309,42.979 18.775,42.979 19.241,42.979 17.843,43.495 18.309,43.495 18.775,43.495 19.241,43.495
  other v7: 3.61,2.851 72.488,2.851 3.61,61.113 72.488,61.113
LDO_PWR: C187.1 C188.1 C200.1 C202.1 C206.1 C208.1 C210.1 C212.1 C214.1 L46.1 R50.2 U29.1 U29.3 U30.1 U30.3 U32.1 U32.3 U33.1 U34.1 U34.3 U35.1 U35.3 U36.1 U36.3 | length 183.2
  Top Layer w0.2: v3(15.057,59.576) 15.074,59.56 C208.1@15.074,58.613 16.246,58.613 U33.1@16.257,58.601 ; C202.1@20.899,5.201 v3(21.557,5.201) 23.282,5.201 23.482,5.001 23.482,3.591 23.365,3.474 U30.3@22.341,3.474 ; v3(23.732,37.726) 23.732,36.949 C206.1@23.72,36.936 23.865,37.081 24.775,37.081 U32.1@24.922,36.934 25.059,37.071 26.127,37.071 26.369,36.829 26.369,35.231 26.04,34.901 25.054,34.901 U32.3@24.922,35.034 ; v3@54.705,59.5 C210.1@54.705,58.644 55.45,58.644 56.142,58.644 U34.1@56.152,58.634 57.313,58.634 57.441,58.506 57.441,56.855 57.314,56.728 56.158,56.728 U34.3@56.152,56.734
  Top Layer w0.3: U29.3@8.398,24.019 8.398,22.749 8.619,22.528 10.016,22.528 10.298,22.81 U29.1@10.298,24.019 10.298,25.377 C200.1@10.309,25.388 ; U35.1@10.11,31.282 U35.1@10.11,31.282 10.162,31.334 10.932,31.334 11.278,30.989 11.278,29.741 10.919,29.382 U35.3@10.11,29.382 ; U35.3@10.16,29.35 10.16,28.144 C212.1@10.359,27.945 ; C200.1@10.355,25.22 10.355,25.47 C200.1@10.4,25.425 ; v1@10.355,27.038 v1(10.374,27.057)
  Top Layer w0.4: v1(15.507,47.001) 15.521,47.014 C188.1@15.521,47.956 ; U36.3@25.475,42.525 25.475,43.847 C214.1@25.59,43.962 ; U36.3@25.55,42.35 25.55,41.409 25.784,41.175 27.166,41.175 27.4,41.409 27.4,42.5 U36.1@27.45,42.55
  Signal Layer 1 w0.2: v1@10.307,27.118 10.725,26.7 10.725,18.5 13.825,15.4 13.825,8.3 14.675,7.45 21.275,7.45 21.529,7.196 21.529,5.23 v3(21.557,5.201) ; v1(10.374,27.057) 10.336,27.096 10.336,27.237 10.307,27.265 10.307,32.876 11.943,34.512 21.187,34.512 23.732,37.057 v3(23.732,37.726) ; v1@15.557,47.001 v1(15.507,47.001) 14.332,47.001 12.807,48.526 12.807,55.651 13.832,56.676 13.832,58.276 14.982,59.426 14.982,59.46 15.061,59.539 15.095,59.539 15.095,59.573 15.173,59.651 15.207,59.651 15.482,59.926 54.299,59.926 v3@54.7,59.525
  Signal Layer 3 w0.25: v1(10.374,27.057) 10.391,27.074 10.391,29.11 19.006,37.726 v3(23.732,37.726) 24.975,38.969 v1(24.975,43.975) ; v1(15.507,47.001) 16.232,46.276 22.654,46.276 v1@24.955,43.975
  other v3: 54.704,59.501
LE_A1: R43.2 U37.13 | length 25.6
  Top Layer w0.1: U37.13@43.332,23.101 43.339,23.094 46.164,23.094 46.382,22.876 46.382,19.926 48.432,17.876 51.865,17.876 52.082,17.659 52.586,17.155 v3(55.513,17.155) ; v3(64.011,17.385) 64.025,17.399 R43.2@64.025,17.98
  Signal Layer 1 w0.1: v3(55.513,17.155) 63.782,17.155 v3(64.011,17.385)
LE_A2: R47.2 U37.14 | length 14.2
  Top Layer w0.1: R47.2@38.629,33.493 38.629,33.709 38.791,33.872 39.181,33.872 v3(39.182,33.873) ; U37.14@43.364,23.494 44.012,23.494 v3(44.019,23.502)
  Signal Layer 2 w0.1: v3(39.182,33.873) 39.781,33.873 41.057,32.596 41.057,26.464 43.938,23.584 v3@44.015,23.584
LNA_5V: C143.2 C144.2 C147.2 C148.2 C170.2 C174.2 C192.1 L42.2 L43.2 L45.2 R38.2 R39.2 R44.2 U26.5 | length 68.9
  Top Layer w0.2: v3(49.005,24.373) 49.014,24.364 49.014,23.865 R44.2@49.037,23.843 49.137,23.943 49.842,23.943 C170.2@49.943,23.843 50.043,23.943 50.748,23.943 C174.2@50.848,23.843 50.96,23.954 51.557,23.954 51.682,23.829 L45.2@51.682,23.765 ; L43.2@62.988,12.702 62.988,12.661 63.113,12.536 63.86,12.536 C148.2@63.954,12.63 64.078,12.506 64.7,12.506 C144.2@64.825,12.63 64.919,12.536 65.601,12.536 R39.2@65.695,12.63 v3(65.695,12.025) ; L42.2@63.686,26.817 63.806,26.696 64.472,26.696 C147.2@64.588,26.812 64.702,26.698 65.372,26.698 C143.2@65.486,26.812 65.601,26.698 66.271,26.698 R38.2@66.385,26.812 ; R38.2@66.308,26.812 66.425,26.695 v3(66.425,26.197)
  Top Layer w0.3: U26.5@64.361,6.217 65.86,6.217 C192.1@65.87,6.227 ; v3(65.77,6.954) 65.77,6.327 C192.1@65.87,6.227 ; C192.1@65.874,6.231 C192.1@65.87,6.227 ; C192.1@66.218,6.227 C192.1@65.87,6.227
  Signal Layer 1 w0.2: v3(49.005,24.373) 48.983,24.373 48.645,24.035 48.645,6.774 48.991,6.429 65.286,6.429 65.77,6.914 v3(65.77,6.954) ; v3(65.695,12.025) 67.134,13.463 67.134,25.489 v3(66.425,26.197)
  Signal Layer 1 w0.25: v3@65.685,12.007 65.77,11.922 v3(65.77,6.954)
  Signal Layer 1 w0.3: v3@65.695,12.011 v3(65.695,12.025)
LO1: C151.1 C182.2 | length 1
  Top Layer w0.3: C182.2@53.37,19.311 C182.2@53.412,19.268 ; C151.1@53.412,18.477 C182.2@53.412,19.368
LO2: C101.2 U22.3
LO_LNA_5V: C152.1 C175.1 C205.1 R37.2 U16.2 U21.2 U31.5 | length 75.4
  Top Layer w0.15: U21.2@38.232,38.728 38.232,39.794 38.32,39.882 C175.1@38.948,39.882 39.057,39.773 v3(39.057,39.401) ; U16.2@63.654,23.283 63.637,23.3 C152.1@63.637,24.598 64.13,24.598 v1@64.632,25.101
  Top Layer w0.2: v3(52.099,9.611) 52.093,9.605 R37.2@51.506,9.605 51.543,9.568 51.543,4.892 v3(51.511,4.86) C205.1@52.705,4.86 ; C205.1@52.691,4.875 C205.1@52.705,4.86 ; U31.5@54.034,4.747 52.818,4.747 C205.1@52.705,4.86
  Signal Layer 1 w0.15: v3(52.099,9.611) 54.031,9.611 54.233,9.814 54.233,19.927 54.441,20.135 58.008,20.135 58.338,20.465 58.338,23.882 59.582,25.126 v1@64.657,25.126
  Signal Layer 2 w0.15: v3(39.057,39.401) 39.057,39.451 39.382,39.776 53.332,39.776 60.225,32.883 60.225,27.433 60.782,26.876 64.085,26.876 64.657,26.304 v1@64.657,25.201
  other v1: 64.657,25.151
LO_N: C39.1 U4.58 | length 1.3
  Top Layer w0.25: U4.58@26.357,24.115 27.439,24.115 C39.1@27.625,23.93
LO_P: C34.1 U4.59 | length 1.3
  Top Layer w0.25: U4.59@26.357,24.615 27.51,24.615 C34.1@27.631,24.736
MCU_3V3: C203.1 C220.2 C221.2 L1.1 L48.1 R52.2 R56.2 U30.5 U37.17 | length 52.7
  Top Layer w0.15: L1.1@24.134,7.983 24.331,7.786 R52.2@25.325,7.786
  Top Layer w0.2: L1.1@24.134,7.983 24.134,6.577 24.134,5.359 24.252,5.242 U30.5@24.994,5.242 ; C203.1@24.188,6.577 24.188,6.498 24.438,6.248 v3(25.1,6.248) ; R56.2@42.061,17.892 42.112,17.841 44.074,17.841 L48.1@44.3,18.068 45.219,18.068 45.259,18.108 v3(45.3,18.108) ; U37.17@42.707,24.951 43.844,24.951 43.885,24.993 43.879,24.999 43.879,25.646 v3(43.875,25.65) ; C220.2@43.71,26.388 43.71,26.73 C220.2@43.809,26.393 ; v3@43.875,25.6 C220.2@43.875,26.069
  Signal Layer 1 w0.2: v3(25.1,6.248) 25.1,7.875 29.81,12.585 46.374,12.585 46.557,12.768 46.557,18.076 ; v3(43.875,25.65) 46.557,22.968 46.557,18.076 ; v3(45.3,18.108) 46.525,18.108 46.557,18.076
MIX_IN: C29.1 C54.1 U4.10 | length 3.8
  Top Layer w0.15: U4.10@21.157,27.815 21.157,28.186 22.012,29.041 C54.1@22.012,29.196 21.585,29.623 21.585,30.57 C29.1@21.229,30.926
MIX_IP: C19.1 C53.1 U4.9 | length 3.7
  Top Layer w0.15: U4.9@21.657,27.815 21.657,28.113 21.703,28.16 21.748,28.16 22.309,28.721 ; C19.1@22.124,30.923 22.124,30.192 22.03,30.097 22.03,30.002 22.16,29.872 22.255,29.872 22.412,29.715 22.412,28.823 22.31,28.721
MIX_QN: C46.1 C47.1 U4.1 | length 3.4
  Top Layer w0.15: C47.1@25.141,30.862 25.374,30.629 25.374,29.621 C46.1@25.799,29.196 25.657,29.054 U4.1@25.657,27.815
MIX_QP: C37.1 C45.1 U4.64 | length 4.1
  Top Layer w0.15: C37.1@25.899,30.934 25.799,30.834 C45.1@25.799,30.093 26.357,29.534 U4.64@26.357,27.115
NetC8_1: C8.1 C9.1 C17.2 L4.1 L5.1 L10.1 | length 8.6
  Top Layer w0.2: L10.1@30.308,18.514 30.511,18.311 31.613,18.311 L5.1@31.777,18.474 31.907,18.344 32.939,18.344 33.189,18.594 C17.2@33.189,18.717 33.034,18.872 33.034,20.059 C9.1@33.265,20.29 33.023,20.533 33.023,21.768 C8.1@33.265,22.01 33.028,22.248 33.028,23.167 L4.1@33.275,23.414
NetC10_2: C10.2 C11.2 C12.2 C13.2 C14.2 C15.2 C16.2 L5.2 U4.57 | length 12.3
  Top Layer w0.15: U4.57@26.357,23.615 27.035,23.615 27.335,23.315 29.24,23.315 29.392,23.163 C14.2@29.392,22.658 ; C16.2@30.123,20.912 29.392,21.643 C15.2@29.392,21.789 29.392,22.659 29.542,22.809 30.078,22.809 C13.2@30.221,22.666 30.364,22.809 30.889,22.809 C12.2@31.04,22.658 ; C12.2@31.115,22.658 31.258,22.801 31.877,22.801 C11.2@32.019,22.658 32.437,22.658 32.54,22.555 32.54,21.142 32.427,21.029 32.137,21.029 C10.2@32.085,20.977 32.085,20.282 L5.2@31.777,19.974
NetC14_1: C14.1 R3.1 U4.56 | length 2.4
  Top Layer w0.15: U4.56@26.357,23.115 26.357,23.065 27.134,23.065 27.528,22.671 R3.1@27.709,22.671 28.466,22.671 C14.1@28.542,22.595
NetC15_1: C15.1 R3.2 R4.1 U4.55 | length 3.2
  Top Layer w0.15: U4.55@26.357,22.615 26.892,22.615 R3.2@27.709,21.798 ; R4.1@27.696,20.907 27.696,21.808 R3.2@27.709,21.821 ; R3.2@27.903,21.789 C15.1@28.542,21.789
NetC16_1: C16.1 R4.2 | length 0.7
  Top Layer w0.15: R4.2@28.539,20.9 29.26,20.9 C16.1@29.273,20.912
NetC18_1: C18.1 C20.2 L8.1 | length 3.6
  Top Layer w0.15: C20.2@45.14,6.807 46.005,6.807 C18.1@46.078,6.88 48.31,6.88 L8.1@48.626,6.564
NetC19_2: C19.2 C23.2 L7.1 L9.1 | length 65.3
  Top Layer w0.15: v3(21.906,32.945) 21.906,31.923 22.056,31.773 C19.2@22.124,31.773 ; C23.2@39.401,6.85 39.401,4.287 L9.1@40.727,2.961 ; v3(41.152,4.099) L9.1@41.152,3.264 43.303,3.264 L7.1@43.313,3.254
  Signal Layer 3 w0.15: v3(21.906,32.945) 21.926,32.925 21.926,31.586 22.406,31.107 22.406,18.822 22.681,18.547 26.97,18.547 27.393,18.124 27.393,4.408 27.702,4.099 37.334,4.099 37.776,4.099 ccw(c37.776,4.428) 38.105,4.428 38.105,6.346 cw(c38.434,6.346) 38.434,6.675 cw(c38.434,6.346) 38.763,6.346 38.763,4.318 ccw(c39.092,4.318) 39.092,3.989 ccw(c39.092,4.318) 39.421,4.318 39.421,6.346 cw(c39.75,6.346) 39.75,6.675 cw(c39.75,6.346) 40.079,6.346 40.079,4.428 ccw(c40.408,4.428) 40.408,4.099 41.141,4.099 v3(41.152,4.099)
NetC20_1: C20.1 C28.2 L7.2 | length 5.9
  Top Layer w0.15: C28.2@43.35,6.85 44.246,6.85 C20.1@44.29,6.807 44.29,4.137 44.454,3.972 46.477,3.972 L7.2@46.485,3.964
NetC22_1: C22.1 L11.2 U2.4 | length 1.6
  Top Layer w0.353: L11.2@28.609,27.884 C22.1@28.609,28.668 U2.4@28.609,29.491
NetC22_2: C22.2 L6.2 U2.3 | length 1.7
  Top Layer w0.353: L6.2@27.691,27.863 27.758,27.93 C22.2@27.758,28.667 ; C22.2@27.763,28.672 U2.3@27.763,29.508
NetC23_1: C23.1 C29.2 L12.2 L14.1 | length 64.7
  Top Layer w0.15: v3(21.213,32.928) 21.229,32.912 C29.2@21.229,31.776 ; C23.1@39.401,7.7 39.401,10.281 L12.2@40.491,11.371 ; v3(41.152,10.576) L12.2@41.152,11.329 43.298,11.329 L14.1@43.38,11.247
  Signal Layer 3 w0.15: v3(21.213,32.928) 21.378,32.764 21.378,16.656 21.784,16.25 25.633,16.25 26.857,15.026 26.857,3.353 26.945,3.265 34.941,3.265 ; 34.942,3.264 41.399,3.264 41.66,3.526 41.66,4.861 41.152,5.369 v3(41.152,10.576)
NetC25_2: C25.2 C26.2 L10.2 U4.54 | length 5.8
  Top Layer w0.15: U4.54@26.357,22.115 26.884,22.115 27.081,21.918 27.081,20.267 27.283,20.065 C25.2@27.762,20.065 28.533,20.065 C26.2@28.808,19.79 28.811,19.788 L10.2@28.811,18.392
NetC27_1: C27.1 C30.2 L15.1 | length 3.9
  Top Layer w0.15: C30.2@45.14,7.758 46.007,7.758 C27.1@46.079,7.686 L15.1@49.029,7.686
NetC28_1: C28.1 C30.1 L14.2 | length 6
  Top Layer w0.15: C28.1@43.35,7.7 44.232,7.7 C30.1@44.29,7.758 44.29,10.433 44.486,10.629 L14.2@46.612,10.629
NetC31_2: C31.2 C32.2 C33.2 L13.2 U4.60 | length 7.6
  Top Layer w0.23: U4.60@26.357,25.115 27.031,25.115 v3(27.037,25.122) ; v3(29.836,25.574) C33.2@29.836,26.157 ; C33.2@29.866,26.157 29.758,26.265 29.758,26.951 C32.2@29.866,27.059 29.758,27.167 29.758,27.849 C31.2@29.866,27.957 29.772,28.051 29.772,28.979 L13.2@29.987,29.195
  Signal Layer 1 w0.23: v3(27.037,25.122) 29.426,25.122 29.836,25.531 v3(29.836,25.574)
NetC34_2: C34.2 L16.2 U3.3 | length 2
  Top Layer w0.25: L16.2@29.286,24.736 L16.2@29.31,24.76 ; U3.3@30.339,24.76 U3.3@30.464,24.884
  Top Layer w0.353: C34.2@28.481,24.736 L16.2@29.286,24.736 ; L16.2@29.31,24.76 U3.3@30.339,24.76
NetC35_1: C35.1 U3.1 | length 3.2
  Top Layer w0.1: U3.1@31.764,24.884 U3.1@31.809,24.839
  Top Layer w0.353: U3.1@31.773,24.894 C35.1@34.925,24.894
  Top Layer w0.37: U3.1@31.764,24.884 U3.1@31.773,24.894
NetC35_2: C35.2 P2.2 | length 0.9
  Top Layer w0.353: C35.2@35.881,25.177 P2.2@35.881,26.098
NetC36_1: C36.1 C38.2 L18.1 | length 2.4
  Top Layer w0.15: C36.1@30.787,3.005 30.787,3.906 30.81,3.929 C38.2@32.255,3.929